# Altium PCB Studio_Clock_hv1.01_PCB_240215a.PcbDoc (part 2 of 5)
Units mm, origin at the board's own origin, x right, y up, seen from the top; angles counter-clockwise.
Board outline 360 x 60 mm, 4 copper layers (TOP, PWR, GND, BOTTOM), stack 0.547 mm thick; 257 components, 289 nets, 969 pads, 664 vias.
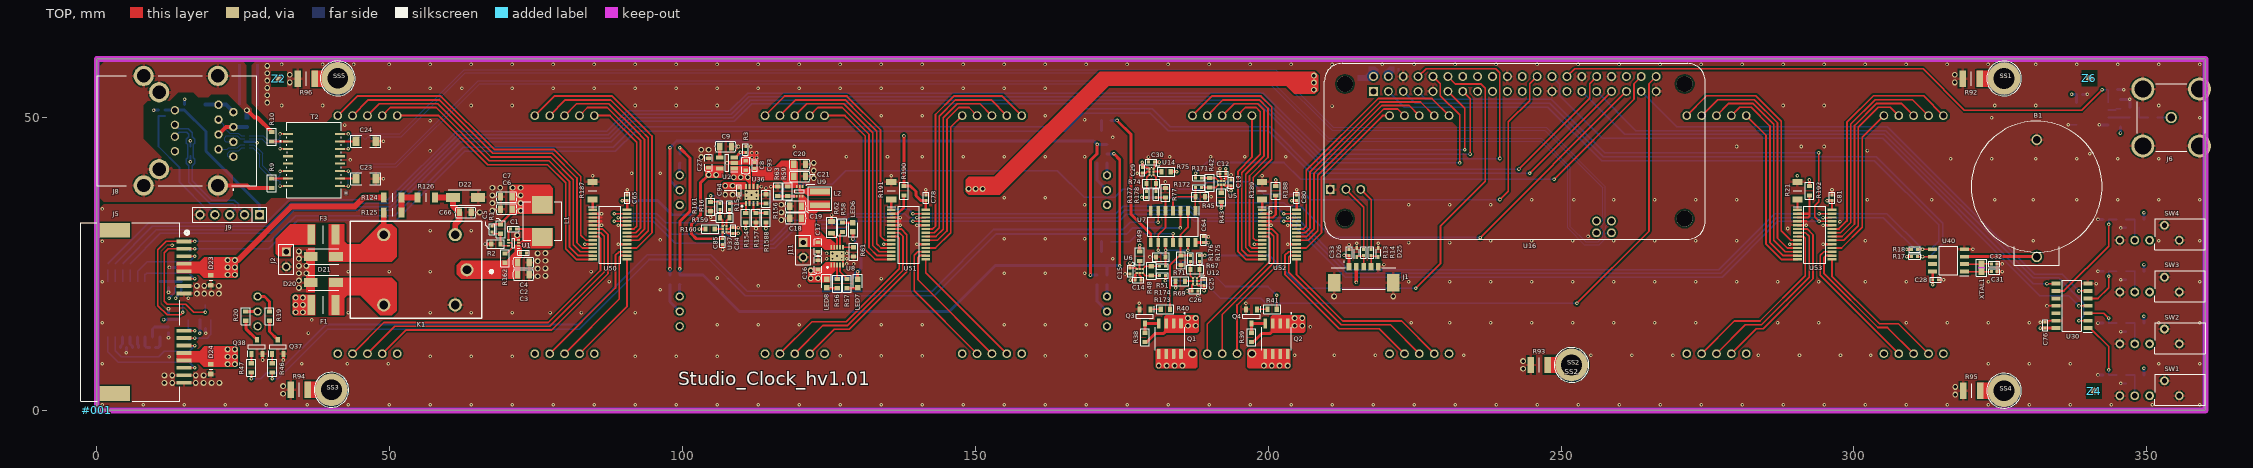
[diagram p0: TOP view]

## Part data (continued)
J5: "CONN MOD JACK 8P8C R/A UNSHLD", Connector type="Jack (RJ45,Ethernet)", Datasheet=https://www.molex.com/content/dam/molex/molex-dot-com/products/automated/en-us/salesdrawingpdf/441/44193/441930003_sd.pdf?inline, DigiKey=https://www.digikey.at/en/products/detail/molex/0441930003/2405005, MNF=Molex, Mounting type="Surface Mount", MPN=0441930003, Series=44193
J6: "CONN BNC JACK R/A 75 OHM PCB", MPN=BNC7T-J-P-HN-RA-BH1, Package=None, Availability="In Stock", Check_prices=https://www.snapeda.com/parts/BNC7T-J-P-HN-RA-BH1/Samtec+Inc./view-part/?ref=eda, ComponentLink1Description=DigiKey, ComponentLink1URL=https://www.digikey.com/en/products/detail/samtec-inc/BNC7T-J-P-HN-RA-BH1/6642961, ComponentLink2Description=Datasheet, ComponentLink2URL=https://suddendocs.samtec.com/prints/bnc7t-j-p-xx-ra-bh1-mkt.pdf, MF=Samtec, Price=None, Purchase-URL=https://pricing.snapeda.com/search/part/BNC7T-J-P-HN-RA-BH1/?ref=eda, SnapEDA_Link=https://www.snapeda.com/parts/BNC7T-J-P-HN-RA-BH1/Samtec+Inc./view-part/?ref=snap
J8: "CONN MOD JACK 8P8C R/A SHIELDED", Copyright="Copyright (C) 2024 Ultra Librarian. All rights reserved.", MFN="TE Connectivity", MPN=1-1775855-1, Type="RJ45+USB -A", Type1=RefDes
K1: "RELAY GEN PURPOSE SPDT 10A 12V", Mfr_Name="Omron Electronics Inc-EMC Div", Copyright="Copyright (C) 2024 Ultra Librarian. All rights reserved.", MPN="G5LE-1 DC12", RefDes=RefDes, Type=DEV
L1: library part IND_WE_74437349047, "FIXED IND 4.7UH 5A 30.8 MOHM SMD", Current - Saturation (Isat)=11A, Current Rating (Amps)="5 A", DC Resistance (DCR)="30.8mOhm Max", INDUCTANCE="4.7 µH", Mfr_Name="Wurth Electronics", ComponentLink1Description=Datasheet, ComponentLink1URL=https://we-online.com/components/products/datasheet/74437349047.pdf, ComponentLink2Description=DigiKey, ComponentLink2URL=https://www.digikey.com/en/products/detail/w%C3%BCrth-elektronik/74437349047/2790977, Manufacturer_Part_Number=74437349047
L2: "FIXED IND 1UH 10.7A 9.78MOHM SM", Current Rating (Amps)="10.7 A", DC Resistance (DCR)="9.78mOhm Max", INDUCTANCE="1 µH", Mfr_Name=Coilcraft, Tolerance=±20%, ComponentLink1Description=DigiKey, ComponentLink1URL=https://www.digikey.com/en/products/detail/coilcraft/xel4030-102mec/21381728, ComponentLink2Description=Datasheet, ComponentLink2URL=https://www.coilcraft.com/en-us/files/datasheet/XEL4030, MPN=XEL4030-101MEB
LED1 LED2 LED3 LED4 LED5: library part LED_484759_bicolor, ComponentLink1Description=Datasheet, ComponentLink1URL=https://cdn.shopify.com/s/files/1/0695/1347/8453/files/484759.pdf, Parameter 1=https://cdn.shopify.com/s/files/1/0695/1347/8453/files/484759.pdf
LED6 LED7 LED8: library part LED_0603_SMD, "LED GREEN CLEAR 0603 SMD", ComponentLink1Description=DigiKey, ComponentLink1URL=https://www.digikey.com/en/products/detail/w%C3%BCrth-elektronik/150060gs75000/4489898, MPN=150060GS75000, Size=0603
Q1 Q2: "MOSFET P-CH 30V 9.7A 8SO", Current - Continuous Drain (Id) @ 25°C="9.7A (Ta)", Drain to Source Voltage (Vdss)=30V, Drive Voltage (Max Rds On, Min Rds On)="2.5V, 10V", Package="SOIC-8 Vishay Siliconix", ComponentLink1Description=Datasheet, ComponentLink1URL=https://www.vishay.com/docs/72295/si4427bd.pdf, DigiKey=https://www.digikey.bg/en/products/detail/vishay-siliconix/SI4427BDY-T1-E3/1656428, FET Type=P-Channel, Gate Charge (Qg) (Max) @ Vgs="70 nC @ 4.5 V", MF="Vishay Siliconix", MPN=SI4427BDY-T1-E3, Vgs(th) (Max) @ Id="1.4V @ 250µA"
Q3 Q4 Q37 Q38 Q39 Q40: "TRANS NPN 40V 0.2A SOT23", Current - Collector (Ic) (Max)="200 mA", Mfr_Name=MCC, Voltage - Collector Emitter Breakdown (Max)="40 V", MPN=MMBT3904-TP, Transistor Type=NPN
R1: library part CMP-001-0628-7, "RES 52.3 KOHM 1% 1/10W 0603", MAnufacturer=YAGEO, Op Temp max=155°C, Op Temp min=-55°C, Package="0603 (1608 Metric)", Power=100mW, Ratings=-, Resistance=52K3, Temperature Coefficient=±100ppm, Tolerance=1%, Component Type="Chip Resistor", ComponentLink1Description=Datasheet, ComponentLink1URL=https://www.yageo.com/upload/media/product/products/datasheet/rchip/PYu-RC_51_RoHS_P_4.pdf, ComponentLink2Description=Mouser, ComponentLink2URL=https://eu.mouser.com/ProductDetail/YAGEO/RC0603FR-0710KL?qs=grNVn54RoB%252B3GtjbJj3wJQ%3D%3D, ComponentLink3Description=Digikey, ComponentLink3URL=https://www.digikey.com/en/products/detail/yageo/RC0603FR-0710KL/726880?s=N4IgTCBcDaIEoGEAMA2JBmAYnAtEg7AIxIDSAMiALoC%2BQA, Composition="Thick Film", Height max=550µm, Mounting type=SM, MPN=RC0603FR-0752K3L, Size="1.60mm x 0.80mm", Size2=0603
R2 R135 R136 R137 R138 R139 R140 R141 R142 R157 R162 R188 R190 R192: library part CMP-001-0628-7, "RES 10K OHM 1% 1/10W 0603", MAnufacturer=YAGEO, Op Temp max=155°C, Op Temp min=-55°C, Package="0603 (1608 Metric)", Power=100mW, Ratings=-, Resistance=10K, Temperature Coefficient=±100ppm, Tolerance=1%, Component Type="Chip Resistor", ComponentLink1Description=Datasheet, ComponentLink1URL=https://www.yageo.com/upload/media/product/products/datasheet/rchip/PYu-RC_51_RoHS_P_4.pdf, ComponentLink2Description=Mouser, ComponentLink2URL=https://eu.mouser.com/ProductDetail/YAGEO/RC0603FR-0710KL?qs=grNVn54RoB%252B3GtjbJj3wJQ%3D%3D, ComponentLink3Description=Digikey, ComponentLink3URL=https://www.digikey.com/en/products/detail/yageo/RC0603FR-0710KL/726880?s=N4IgTCBcDaIEoGEAMA2JBmAYnAtEg7AIxIDSAMiALoC%2BQA, Composition="Thick Film", Height max=550µm, Mounting type=SM, MPN=RC0603FR-0710KL, PMNT=DNP, Size="1.60mm x 0.80mm", Size2=0603
R3 R127 R128 R131: library part CMP-001-0484-6, "RES SMD 0 OHM JUMPER 1/16W 0402", MAnufacturer=YAGEO, Op Temp max=155°C, Op Temp min=-55°C, Package="0402 (1005 Metric)", Power=63mW, Ratings=-, Resistance=0, Temperature Coefficient=±100ppm, Tolerance=Jumper, Component Type="Chip Resistor", ComponentLink1Description=Datasheet, ComponentLink1URL=https://www.yageo.com/upload/media/product/productsearch/datasheet/rchip/PYu-RC_Group_51_RoHS_L_12.pdf, ComponentLink2Description=Mouser, ComponentLink2URL=https://eu.mouser.com/ProductDetail/YAGEO/RC0402FR-0727RL?qs=UOUeRUa%252B8Wlb37UyFHw9Bw%3D%3D, ComponentLink3Description=Digikey, ComponentLink3URL=https://www.digikey.com/en/products/detail/yageo/RC0402FR-0727RL/5280946, Composition="Thick Film", Height max=400µm, Mounting type=SM, Size="1.00mm x 0.50mm"
  R3 R127 R131: MPN=DNP
  R128: MPN=AC0402JR-070RL
R4: library part CMP-001-0628-7, "RES 15K OHM 1% 1/10W 0603", MAnufacturer=YAGEO, Op Temp max=155°C, Op Temp min=-55°C, Package="0603 (1608 Metric)", Power=100mW, Ratings=-, Resistance=15K, Temperature Coefficient=±100ppm, Tolerance=1%, Component Type="Chip Resistor", ComponentLink1Description=Datasheet, ComponentLink1URL=https://www.yageo.com/upload/media/product/products/datasheet/rchip/PYu-RC_51_RoHS_P_4.pdf, ComponentLink2Description=Mouser, ComponentLink2URL=https://eu.mouser.com/ProductDetail/YAGEO/RC0603FR-0710KL?qs=grNVn54RoB%252B3GtjbJj3wJQ%3D%3D, ComponentLink3Description=Digikey, ComponentLink3URL=https://www.digikey.com/en/products/detail/yageo/RC0603FR-0710KL/726880?s=N4IgTCBcDaIEoGEAMA2JBmAYnAtEg7AIxIDSAMiALoC%2BQA, Composition="Thick Film", Height max=550µm, Mounting type=SM, MPN=RC0603FR-0715KL, Size="1.60mm x 0.80mm", Size2=0603